# Altium PCB PCB2.PcbDoc
Units mil, origin at the board's own origin, x right, y up, seen from the top; angles counter-clockwise.
Board outline 3401.25 x 3741.25 mil, 2 copper layers (Top Layer, Bottom Layer); 34 components, 36 nets, 154 pads, 22 vias.
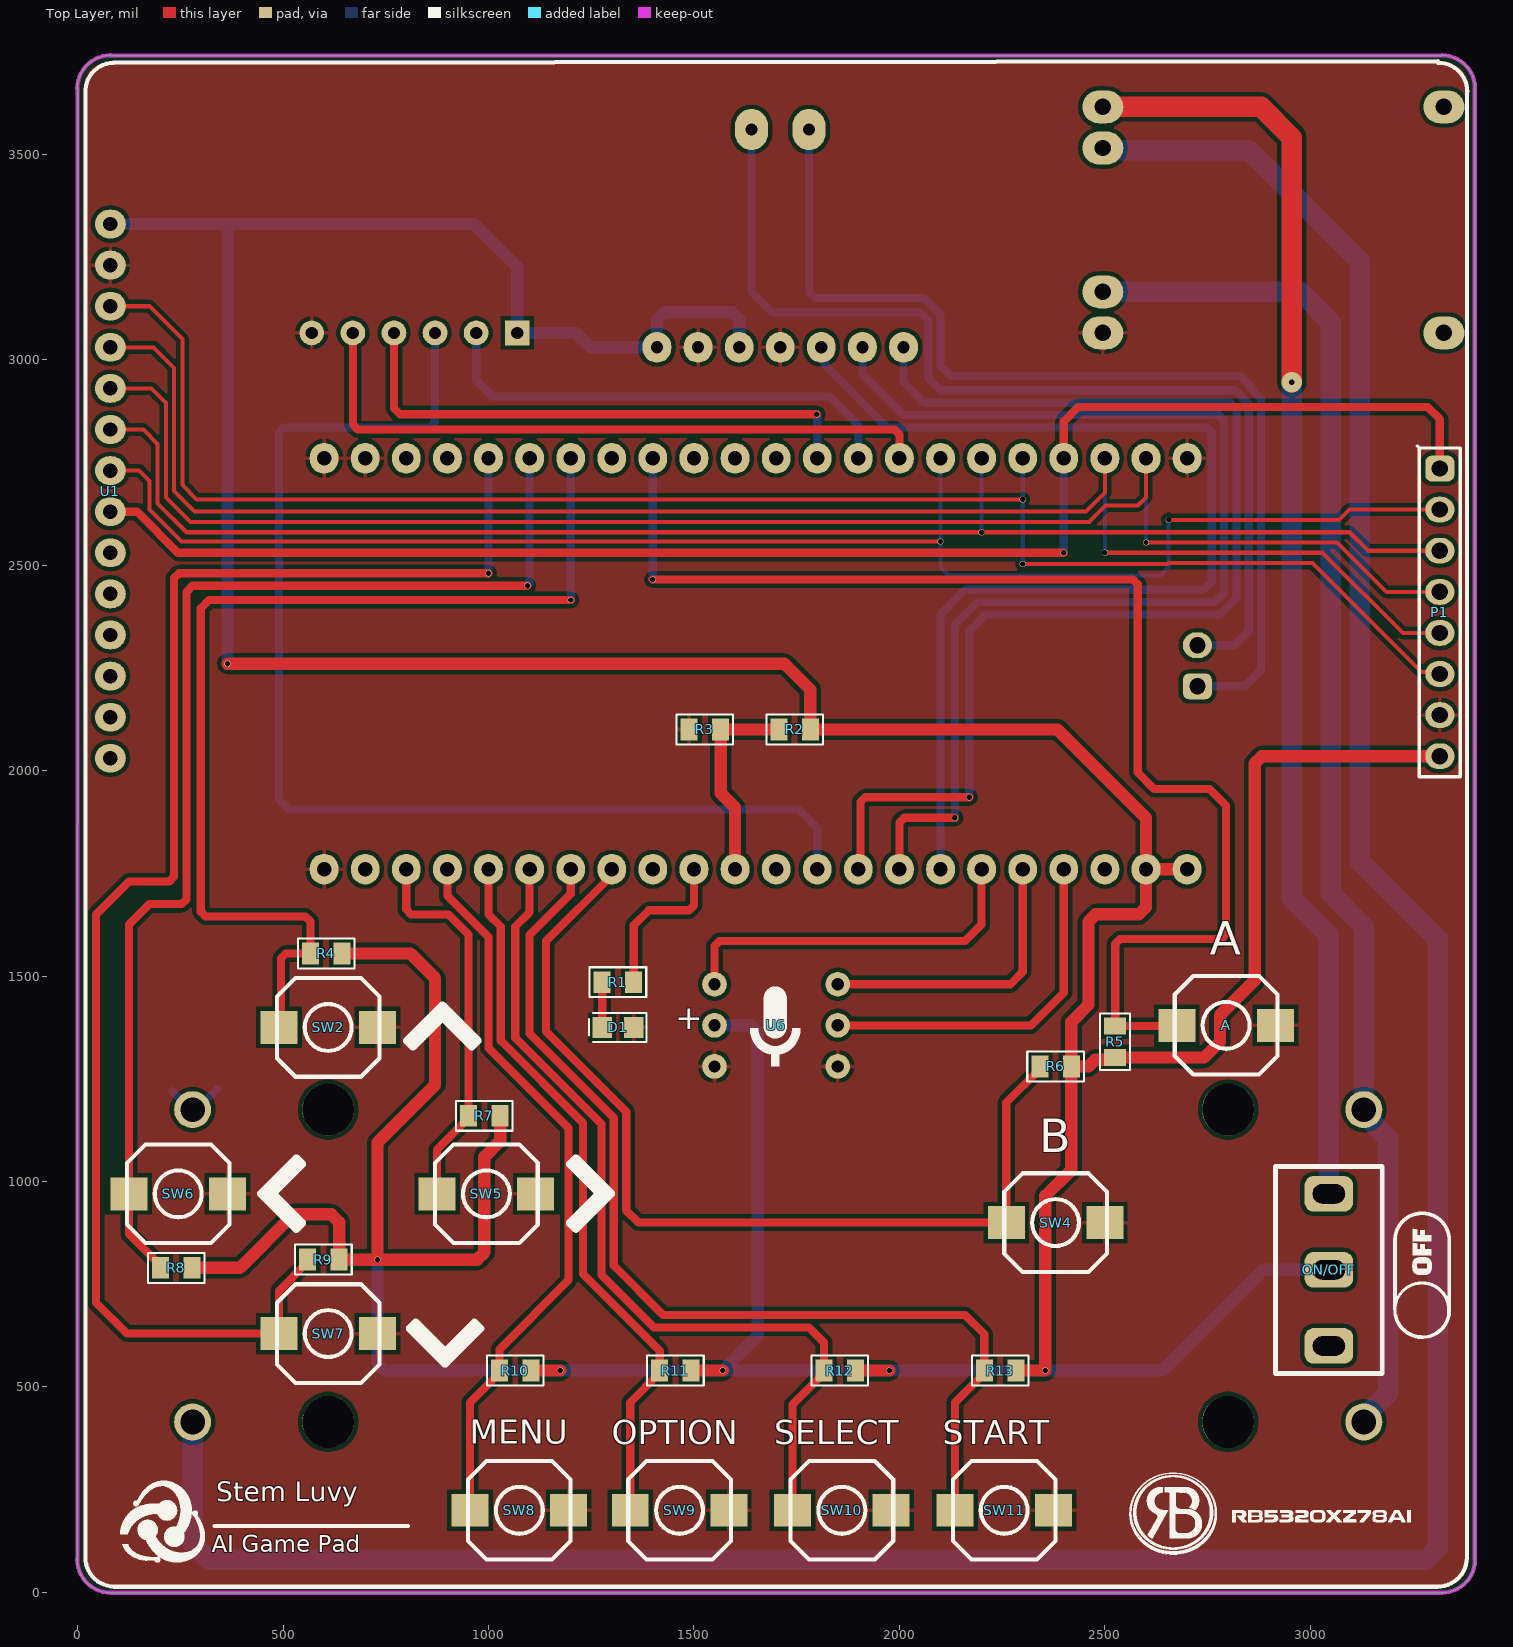
[diagram p0: Top Layer view]
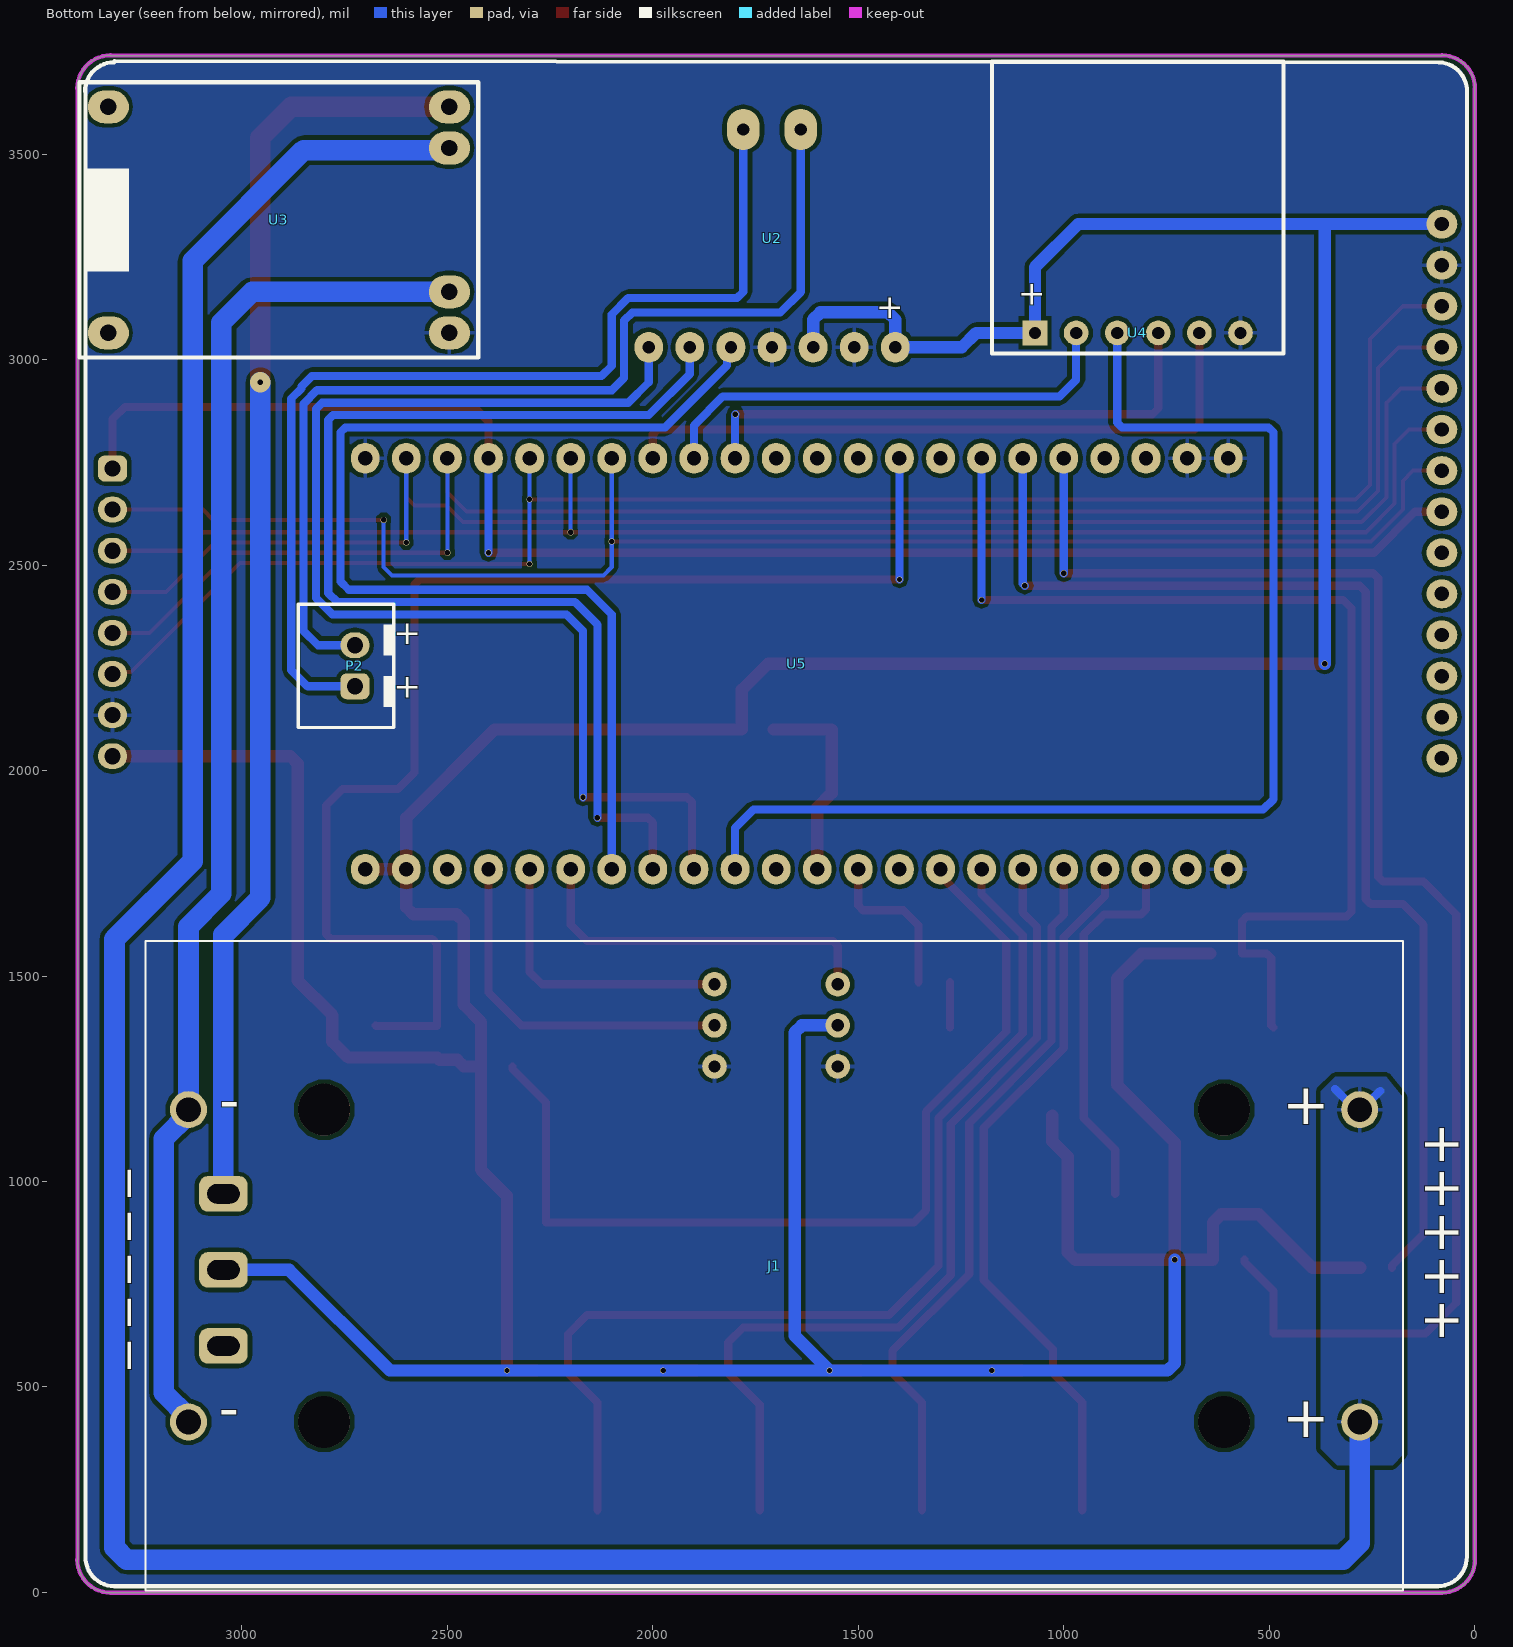
[diagram p1: Bottom Layer view, seen from below]

## Layer stack, top to bottom
Top Solder: solder mask 0.4, Solder Resist, Dk 3.5
Top Layer: signal copper 1.4
Dielectric 1: dielectric 12.6, FR-4, Dk 4.8
Bottom Layer: signal copper 1.4
Bottom Solder: solder mask 0.4, Solder Resist, Dk 3.5

## Board outline
-0.62,80 ccw(c80,80) 80,-0.62 3320,-0.62 ccw(c3320,80) 3400.62,80 3400,80 3400,3660 3400.62,3660 ccw(c3320,3660) 3320,3740.62 3320,3740 80,3740 80,3740.62 ccw(c80,3660) -0.62,3660 0,3660

## Design rules (kind name [scope] priority, off if disabled: settings)
Clearance [All] p1: gap=10 ignorepadtopadclearanceinfootprint=FALSE except(0: Arc-Hole Track-Hole SMDPad-Hole THPad-Hole Via-Hole Fill-Hole Poly-Hole Region-Hole Text-Hole)
PolygonConnect [All] p1: connectstyle=Relief reliefconductorwidth=10 reliefentries=4 polygonreliefangle="90 Angle" airgapwidth=10
RoutingVias [All] p1: holewidth=13 width=15 viastyle="Through Hole" minholewidth=13 minwidth=15 maxholewidth=13 maxwidth=15
SolderMaskExpansion [IsVia] p1: expansion=-1 istentingtop=FALSE
Width [All] p1: maxlimit=30 minlimit=10 preferedwidth=20
30 further rules are at their usual default settings.

## Components (designator, comment, footprint, x,y, rotation, side; value= is the part's Value field where it differs from the comment)
A "A" Button2Psilicon 2675,1380 r0 top (schematic designator SW3)
D1 "Led" "Led 0805" 1315,1375 r0 top
J1 "BK-18650-PC4" 18650-PC4 1705,795 r0 bottom
ON/OFF "POWER" SW/3/SPDT/SS12D10 3045,785 r90 top (schematic designator SW1)
P1 "Header 8" HDR/Header/8 3315,2385 r270 top
P2 "LOA" HDR/Header/2/BOX 2725,2255 r0 bottom
R1 "R" "R 0805" 1315,1485 r0 top
R2 "R" "R 0805" 1745,2100 r0 top
R3 "R" "R 0805" 1526.61,2100 r0 top
R4 "R" "R 0805" 605,1555 r0 top
R5 "R" "R 0805" 2525,1340 r270 top
R6 "R" "R 0805" 2380,1280 r0 top
R7 "R" "R 0805" 990,1160 r0 top
R8 "R" "R 0805" 240,790 r0 top
R9 "R" "R 0805" 598.39,810 r0 top
R10 "R" "R 0805" 1065,540 r0 top
R11 "R" "R 0805" 1455,540 r0 top
R12 "R" "R 0805" 1855,540 r0 top
R13 "R" "R 0805" 2245,540 r0 top
SW2 "UP" Button2Psilicon 490,1375 r0 top
SW4 "B" Button2Psilicon 2260,900 r0 top
SW5 "RIGHT" Button2Psilicon 875,970 r0 top
SW6 "LEFT" Button2Psilicon 125,970 r0 top
SW7 "DOWN" Button2Psilicon 490,630 r0 top
SW8 "MENU" Button2Psilicon 955,200 r0 top
SW9 "OPTION" Button2Psilicon 1345,200 r0 top
SW10 "SELECT" Button2Psilicon 1740,200 r0 top
SW11 "START" Button2Psilicon 2135,200 r0 top
U1 "TFT28" "TFT - duplicate" 80,2030 r90 top
U2 "MAX98357" MAX98357 2010,3030 r180 bottom
U3 "MACH_SAC_5V" TP4056 3325,3065 r90 bottom
U4 "SD CARD" SDCARD_MODULE 1070,3065 r90 bottom
U5 "ESP32_S3_MODULE" ESP32_S3_MODULE 600,1760 r0 bottom
U6 "MIC_IMP441" IMP441 1550,1480 r0 top

## Footprints (in the part's own frame and the unit in brackets; to place one, negate y for a bottom-side part, rotate by r counter-clockwise, add the part's x,y. Pads: shape width x height; smd on the part's side, far side on the other; paste and mask are expansions set on the pad)
18650-PC4 [mil]
  round 90 hole 60: +1(-1425,380) +2(-1425,-380) -1(1425,380) -2(1425,-380)
  round 126 hole 126 unplated: ""(-1095,-380) ""(-1095,380) ""(1095,-380) ""(1095,380)
  silkscreen extent -1530,-790 1530,790, body extent -1530,-792 1530,792, height 974
Button2Psilicon [mil]
  rect 90x80 smd: 1(0,0) 2(240,0)
  silkscreen extent -5,-120 245,120, body extent -4,-116 244,116, height 195
ESP32_S3_MODULE [mil]
  oval 70x75 hole 35: 0(0,0) 1(100,0) 2(200,0) 3(300,0) 4(400,0) 5(500,0) 6(600,0) 7(700,0) 8(800,0) 9(900,0) 10(1000,0) 11(1100,0) 12(1200,0) 13(1300,0) 14(1400,0) 15(1500,0) 16(1600,0) 17(1700,0) 18(1800,0) 19(1900,0) 20(2000,0) 21(2100,0) 22(0,-1000) 23(100,-1000) 24(200,-1000) 25(300,-1000) 26(400,-1000) 27(500,-1000) 28(600,-1000) 29(700,-1000) 30(800,-1000) 31(900,-1000) 32(1000,-1000) 33(1100,-1000) 34(1200,-1000) 35(1300,-1000) 36(1400,-1000) 37(1500,-1000) 38(1600,-1000) 39(1700,-1000) 40(1800,-1000) 41(1900,-1000) 42(2000,-1000) 43(2100,-1000)
  body extent -100,-1050 2421,50, height 426
HDR/Header/2/BOX [mm]
  rrect50% 1.8x1.6 hole 1: 1(0,1.27)
  oval 1.8x1.6 hole 1: 2(0,-1.27)
  silkscreen extent -2.41,-3.81 3.5,3.81, body extent -2.35,-3.7 3.4,3.7, height 7
HDR/Header/8 [mm]
  rrect50% 1.6x1.8 hole 1: 1(-8.89,0)
  oval 1.6x1.8 hole 1: 2(-6.35,0) 3(-3.81,0) 4(-1.27,0) 5(1.27,0) 6(3.81,0) 7(6.35,0) 8(8.89,0)
  silkscreen extent -10.29,-1.4 10.16,1.27, body extent -10.16,-1.27 10.16,1.27, height 8.89
IMP441 [mil]
  round 60 hole 30: 0(0,0) 1(0,-100) 2(0,-200) 3(300,0) 4(300,-100) 5(300,-200)
  body extent -122,-382 420,178, height 411
"Led 0805" [mm] "Led SMD 0805"
  rect 1.2x1.3 smd: 1(-0.975,0) 2(0.975,0)
  silkscreen extent -1.78,-0.89 1.78,0.89, body extent -1.01,-0.64 1.01,0.61, height 1.1
MAX98357 [mil]
  oval 70x75 hole 30: 0(0,0) 1(100,0) 2(200,0) 3(300,0) 4(400,0) 5(500,0) 6(600,0)
  oval 80x100 hole 30: 7(230,530) 8(370,530)
  body extent -54,-99 654,665, height 656
"R 0805" [mm] "Chip Resistor, 2-Leads, Body 2.0x1.3mm, IPC Medium Density"
  rect 1.05x1.35 smd: 1(-0.975,0) 2(0.975,0)
  silkscreen extent -1.75,-0.92 1.75,0.92, body extent -1,-0.61 1,0.59, height 0.5
SDCARD_MODULE [mil]
  rect 60x60 hole 30: 1(0,0)
  round 60 hole 30: 2(0,-100) 3(0,-200) 4(0,-300) 5(0,-400) 6(0,-500)
  silkscreen extent -50,-605 660,105, body extent -51,-606 761,107, height 133
SW/3/SPDT/SS12D10 [mm]
  rrect50% 2.2x3 hole 1.2 slot 2 at 90 deg: 1(-4.7,0) 2(0,0) 3(4.7,0)
  silkscreen extent -6.4,-3.3 6.4,3.3, body extent -6.4,-3.3 6.35,3.8, height 12.5
"TFT - duplicate" [mil]
  oval 70x75 hole 35: 1(1300,0) 2(1200,0) 3(1100,0) 4(1000,0) 5(900,0) 6(800,0) 7(700,0) 8(600,0) 9(500,0) 10(400,0) 11(300,0) 12(200,0) 13(100,0) 14(0,0)
  body extent -335,-3311 1635,75, height 332
TP4056 [mil]
  oval 80x100 hole 40: 0(0,0) 1(550,0) 2(0,-830) 3(100,-830) 4(450,-830) 5(550,-830)
  silkscreen extent -60,-900 610,70, body extent -66,-1044 620,109, height 163

## Part data
A SW2 SW4 SW5 SW6 SW7 SW8 SW9 SW10 SW11: library part "Silicone 2P button SMD"
D1: "Typical LED"
J1: "Battery Holder (Open) 18650 2 Cell PC Pin", Package=None, Check_prices=https://www.snapeda.com/parts/BK-18650-PC4/Memory+Protection+Devices/view-part/?ref=eda, MF="MPD (Memory Protection Devices)", MP=BK-18650-PC4, SnapEDA_Link=https://www.snapeda.com/parts/BK-18650-PC4/Memory+Protection+Devices/view-part/?ref=snap
ON/OFF: library part "SW SPDT"
P1: "Header, 8-Pin"
P2: library part "Header 2", "Header, 2-Pin"
R1 R2 R3 R4 R5 R6 R7 R8 R9 R10 R11 R12 R13: library part Resistor, "Resistor"
U4: library part "SD Card Module"

## Via types
v1: diameter 15, hole 13, Top Layer to Bottom Layer, 21 vias
v2: diameter 50, hole 13, Top Layer to Bottom Layer, 1 vias

## Nets (pads, with @x,y where several pads share a name; then routed paths per layer and width w, separated by ;. In a path a pad name is that pad's centre, name@x,y a point inside that pad or via, vN(x,y) a via of type N, cw(c..) or ccw(c..) an arc to the next point about the centre after c; other vN are vias at no path point)
3.3: ON/OFF.2 P1.8 R2.2 R4.2 R5.2 R6.2 R7.2 R8.2 R9.2 R10.2 R11.2 R12.2 R13.2 U1.1 U2.4 U2.6 U4.1 U5.20 U5.21 U6.1 | length 14740.7
  Top Layer w30: R8.2 395,790 525,920 617.43,920 636.77,900.65 R9.2 v1(730,810) ; v1(365,2260) 1720,2260 1783.39,2196.61 R2.2 2385,2100 2600,1885 U5.20 ; R4.2 810,1555 870,1495 870,1235 730,1095 v1(730,810) ; R7.2 1028.39,1098.39 990,1060 990,827.57 972.43,810 v1(730,810) ; R10.2 v1(1175,540) ; R11.2 v1(1570,540) ; R12.2 v1(1975,540) ; R13.2 v1(2355,540) 2355,965 2418.39,1028.39 R6.2 ; U5.21 U5.20 ; P1.8 2882.05,2035 2864.48,2017.43 2864.48,1489.48 2780,1405 2780,1340 2741.61,1301.61 R5.2 2519.33,1295.94 2475.94,1295.94 2460,1280 R6.2 ; R6.2 2418.39,1388.39 2460,1430 2460,1632.43 2477.57,1650 2582.43,1650 2600,1667.57 U5.20
  Bottom Layer w30: U1.1 365,3330 ; v1(365,2260) 365,3330 ; v1(730,810) 730,557.57 747.57,540 v1(1175,540) v1(1570,540) ; U6.1 1637.43,1380 1655,1362.43 1655,625 v1(1570,540) ; U2.4 1610,3097.43 1592.43,3115 1427.57,3115 1410,3097.43 U2.6 1248.26,3030 1213.26,3065 U4.1 1070,3225 965,3330 365,3330 ; ON/OFF.2 2885,785 2640,540 v1(2355,540) v1(1975,540) v1(1570,540)
B_A: A.1 R5.1 U5.30 | length 3129.8
  Top Layer w20: v1(1400,2465) 2568.28,2465 2580,2453.28 2580,1995 2620,1955 2755,1955 2795,1915 2795,1601.72 2783.28,1590 2536.72,1590 2525,1578.28 R5.1 2673.39,1378.39 A.1
  Bottom Layer w20: v1(1400,2465) U5.30
B_B: R6.1 SW4.1 U5.7 | length 2328.3
  Top Layer w20: U5.7 1300,1745 1140,1585 1140,1365 1335,1170 1335,930 1365,900 SW4.1 2260,1192.48 2341.61,1274.09 R6.1
B_DOWN: R9.1 SW7.1 U5.26 | length 3634.5
  Top Layer w20: R9.1 560,804.09 490,734.09 SW7.1 120,630 45,705 45,1650 125,1730 223.28,1730 235,1741.72 235,2468.28 246.72,2480 v1(1000,2480)
  Bottom Layer w20: v1(1000,2480) U5.26
B_LEFT: R8.1 SW6.1 U5.27 | length 2928.9
  Top Layer w20: R8.1 201.61,795.91 125,872.52 SW6.1 125,1625 175,1675 253.28,1675 265,1686.72 265,2435 280,2450 v1(1095,2450)
  Bottom Layer w20: v1(1095,2450) 1100,2455 U5.27
B_MENU: R10.1 SW8.1 U5.3 | length 1781.6
  Top Layer w20: U5.3 900,1695 940,1655 1000,1595 1000,1325 1195,1130 1195,760 1026.61,591.61 1026.61,534.09 955,462.48 SW8.1
B_OPTION: R11.1 SW9.1 U5.4 | length 1762.2
  Top Layer w20: U5.4 1000,1650 1030,1620 1030,1342.57 1230,1142.57 1230,775 1416.61,588.39 1416.61,534.09 1345,462.48 SW9.1
B_RIGHT: R7.1 SW5.1 U5.2 | length 937.8
  Top Layer w20: U5.2 800,1661.72 811.72,1650 902.57,1650 951.61,1600.96 R7.1 951.61,1154.09 875,1077.48 SW5.1
B_SELECT: R12.1 SW10.1 U5.5 | length 2138.7
  Top Layer w20: U5.5 1100,1655 1065,1620 1065,1350 1275,1140 1275,772.43 1402.43,645 1780,645 1816.61,608.39 R12.1 1816.61,534.09 1740,457.48 SW10.1
B_START: R13.1 SW11.1 U5.6 | length 2520
  Top Layer w20: U5.6 1200,1700 1100,1600 1100,1360 1305,1155 1305,795 1425,675 2160,675 2206.61,628.39 R13.1 2206.61,534.09 2135,462.48 SW11.1
B_UP: R4.1 SW2.1 U5.28 | length 2593
  Top Layer w20: SW2.1 495,1380 495,1543.28 506.72,1555 R4.1 566.61,1633.28 554.9,1645 311.72,1645 300,1656.72 300,2395 320,2415 v1(1200,2415)
  Bottom Layer w20: v1(1200,2415) U5.28
GND: A.2 D1.2 P1.7 R3.1 SW2.2 SW4.2 SW5.2 SW6.2 SW7.2 SW8.2 SW9.2 SW10.2 SW11.2 U1.2 U2.3 U2.5 U3.2 U4.6 U5.0 U5.22 U5.23 U5.43 U6.2 U6.5
MAX_BCLK: U2.1 U5.14 | length 2822.3
  Top Layer w20: U5.14 2000,1873.28 2011.72,1885 v1(2135,1885)
  Bottom Layer w20: U2.1 1910,2965 2010,2865 2778.28,2865 2790,2853.28 2790,2432.43 2767.57,2410 2190,2410 2135,2355 v1(2135,1885)
MAX_DIN: U2.2 U5.15 | length 2732.5
  Bottom Layer w20: U2.2 1819.57,3020.43 1819.57,2985.43 1970,2835 2748.28,2835 2760,2823.28 2760,2460 2740,2440 2160,2440 2100,2380 U5.15
MAX_LRC: U2.0 U5.13 | length 2905.3
  Top Layer w20: U5.13 1905,1765 1905,1923.28 1916.72,1935 v1(2170,1935)
  Bottom Layer w20: U2.0 2010,2945 2060,2895 2805,2895 2820,2880 2820,2420 2780,2380 2210,2380 2170,2340 v1(2170,1935)
MIC_SCK: U5.17 U6.3 | length 712.4
  Top Layer w20: U6.3 2270,1480 2300,1510 U5.17
MIC_SD: U5.16 U6.0 | length 899.7
  Top Layer w20: U6.0 1550,1573.28 1561.72,1585 2160,1585 2200,1625 U5.16
MIC_WS: U5.18 U6.4 | length 883.1
  Top Layer w20: U6.4 2320,1380 2400,1460 U5.18
NetD1_1: D1.1 R1.1 | length 110
  Top Layer w20: D1.1 R1.1
NetP2_1: P2.1 U2.7 | length 2510.4
  Bottom Layer w20: U2.7 1780,3165 1795,3150 2060,3150 2100,3110 2100,2985 2125,2960 2830,2960 2855,2935 2855,2929.85 2880,2904.85 2880,2245 2840,2205 P2.1
NetP2_2: P2.2 U2.8 | length 2491.8
  Bottom Layer w20: U2.8 1640,3165 1690,3115 2050,3115 2070,3095 2070,2955 2099.39,2925.61 2816.82,2925.61 2850,2892.43 2850,2340 2815,2305 P2.2
NetSW1_3: ON/OFF.3 U3.5 | length 3098.3
  Top Layer w50: U3.5 2880,3615 2955,3540 v2(2955,2945)
  Bottom Layer w50: v2(2955,2945) 2955,1690 3045,1600 ON/OFF.3
POWER_STS: R2.1 R3.2 U5.10 | length 496.1
  Top Layer w30: U5.10 1600,1910 1565,1945 R3.2 R2.1
SD_CLK: U4.4 U5.34 | length 1325.9
  Top Layer w20: U4.4 770,2881.72 784.66,2867.05 v1(1799.09,2867.05)
  Bottom Layer w20: v1(1799.09,2867.05) 1800,2866.14 U5.34
SD_CS: U4.2 U5.35 | length 1170.6
  Bottom Layer w20: U4.2 970,2950 1010,2910 1830,2910 1900,2840 U5.35
SD_MISO: U4.5 U5.36 | length 1621.3
  Top Layer w20: U4.5 670,2841.72 681.72,2830 1988.28,2830 2000,2818.28 U5.36
SD_MOSI: U4.3 U5.12 | length 2940.3
  Bottom Layer w20: U4.3 870,2846.72 858.28,2835 501.72,2835 490,2823.28 490,1930 515,1905 1755,1905 1800,1860 U5.12
STS_LED: R1.2 U5.9 | length 393.3
  Top Layer w20: R1.2 1353.39,1623.39 1390,1660 1488.28,1660 1500,1671.72 U5.9
TFT_CS: P1.6 U1.3 U5.39 | length 4008
  Top Layer w10: U1.3 175,3130 255,3050 255,2695 290,2660 v1(2300,2660) ; v1(2300,2502.5) 2651.93,2502.5 2654.43,2505 3005,2505 3270.42,2239.58 3310.42,2239.58 P1.6
  Bottom Layer w10: v1(2300,2502.5) v1(2300,2660) U5.39
TFT_DC: P1.4 U1.5 U5.42 | length 3878.9
  Top Layer w10: U1.5 180,2930 215,2895 215,2665 275,2605 2461.82,2605 2501.82,2645 2580,2645 2600,2665 U5.42 ; v1(2600,2555) 3065,2555 3185,2435 P1.4
  Bottom Layer w10: v1(2600,2555) U5.42
TFT_LED: P1.1 U1.8 U5.40 | length 3750.4
  Top Layer w10: U5.40 U5.40@2405,2755
  Top Layer w20: U1.8 145,2630 245,2530 v1(2400,2530) ; U5.40 2400,2850 2435,2885 3285,2885 3315,2855 P1.1
  Bottom Layer w20: v1(2400,2530) U5.40
TFT_RST: P1.5 U1.4 U5.41 | length 3990
  Top Layer w10: U1.4 185,3030 235,2980 235,2680 285,2630 2453.65,2630 2500,2676.35 U5.41 ; v1(2500,2530) 3030,2530 3225,2335 P1.5
  Bottom Layer w10: v1(2500,2530) U5.41
TFT_SCK: P1.2 U1.7 U5.37 | length 3761.2
  Top Layer w10: U1.7 150,2730 175,2705 175,2635.36 252.86,2557.5 v1(2100,2557.5) ; U5.37 U5.37@2105,2755 ; v1(2655,2610) 3070,2610 3095,2635 P1.2
  Bottom Layer w10: U5.37 2100,2495 2120,2475 2635,2475 2655,2495 v1(2655,2610)
TFT_SDI: P1.3 U1.6 U5.38 | length 3622.1
  Top Layer w10: U1.6 160,2830 195,2795 195,2650 265,2580 v1(2200,2580) 3095,2580 3140,2535 P1.3
  Bottom Layer w10: v1(2200,2580) U5.38
VIN+: J1.+1 J1.+2 U3.4 | length 7451.4
  Bottom Layer w20: 230,1220 275,1175 J1.+2 290,1175 340,1225
  Bottom Layer w50: J1.+1 280,120 320,80 3280.71,80 3310,109.29 3310,1590 3120,1780 3120,3240 2850,3510 2500,3510 U3.4
VIN-: J1.-1 J1.-2 U3.3 | length 3343.9
  Bottom Layer w50: U3.3 2975,3165 3050,3090 3050,1700 3130,1620 J1.-2 3130,1164.18 3190,1104.18 3190,485.82 3130,425.82 J1.-1
pads on no net: J1. ON/OFF.1 U1.9 U1.10 U1.11 U1.12 U1.13 U1.14 U3.0 U3.1 U5.1 U5.8 U5.11 U5.19 U5.24 U5.25 U5.29 U5.31 U5.32 U5.33

## Polygon pours and split planes (outlines as drawn)
GND on Bottom Layer "NONET_L-01_P-001" (solid, remove dead copper, pour order 1): 3790,-210 3760,-180 3760,4130 -560,4130 -625,4065 -585,4025 -585,-715
VIN+ on Bottom Layer "NONET_L-01_P-001" (solid, remove dead copper, pour order 0): 215,1255 340,1255 375,1220 375,350 335,310 200,310 175,335 175,355 175,1205
GND on Top Layer "NONET_L-01_P-001" (solid, remove dead copper, pour order 2): -695,4175 3960,4175 4000,4135 3975,4110 3975,-520 -1050,-520 -1135,-435

## Keep-outs
Keep-Out Layer:
  lines w10: -0.62,80 ccw(c80,80) 80,-0.62 3320,-0.62 ccw(c3320,80) 3400.62,80 ; -0.62,3660 cw(c80,3660) 80,3740.62 ; 0,80 0,3660 ; 80,3740 3320,3740 ; 3320,3740.62 cw(c3320,3660) 3400.62,3660 ; 3400,80 3400,3660

## Silkscreen, mask and mechanical layers (free items; w line width, h text height)
Top Overlay:
  drawing of 39 lines, arcs and shapes, not listed
  text "A" at 2755,1525 h140
  text "+" at 1455,1350.77 h100
  text "B" at 2340,1045 h140
  text "MENU" at 955,342.22 h100
  text "OPTION" at 1300,341.18 h100
  text "SELECT" at 1695,341.18 h100
  text "START" at 2105,341.18 h100
  text "Stem Luvy" at 338,205.81 h80
  text "AI Game Pad" at 326,84 h70
Bottom Overlay:
  lines w10: 19,86.98 19,3650 cw(c89.36,3653.09) 87.46,3723.5 ; 19.3,86.98 ccw(c90,85.99) 88.98,15.29 ; 87.46,3723.43 3310,3726.99 ; 88.98,15 3310,15 ; 3310,15.29 ccw(c3310,86) 3380.71,86 ; 3311.05,3723.5 cw(c3311.05,3652.79) 3381.76,3652.79 ; 3381,86 3381,3656
  text "+" at 1044,3113.77 h100
  text "+" at 1390,3080.77 h100
  text "+" at 2564,2287.77 h100
  text "+" at 2564,2157.77 h100
  text "+++++" at 150.78,608 h160 r90
  text "_ _ _ _ _" at 3277.67,544 h160 r90

## Text inside footprints (layer, text, board x,y; h text height)
J1: Bottom Overlay "-" at 3005.12,1225.04 h100.01 r180; Bottom Overlay "-" at 3006.13,474.72 h100.09 r180; Bottom Overlay "+" at 353.12,1225.6 h100.14 r180; Bottom Overlay "+" at 353.24,464.57 h100.13 r180